# Altium PCB MMU.pcbdoc
Units mil, origin at the board's own origin, x right, y up, seen from the top; angles counter-clockwise.
Board outline 787.4 x 472.4 mil, 2 copper layers (Top Layer, Bottom Layer), stack 62.2 mil thick; 9 components, 7 nets, 52 pads, 17 vias.
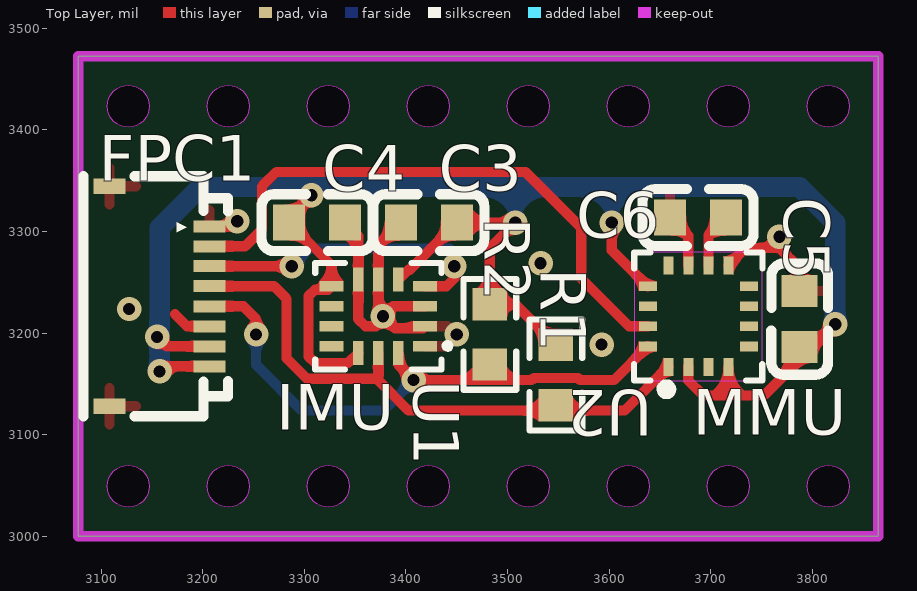
[diagram p0: Top Layer view]
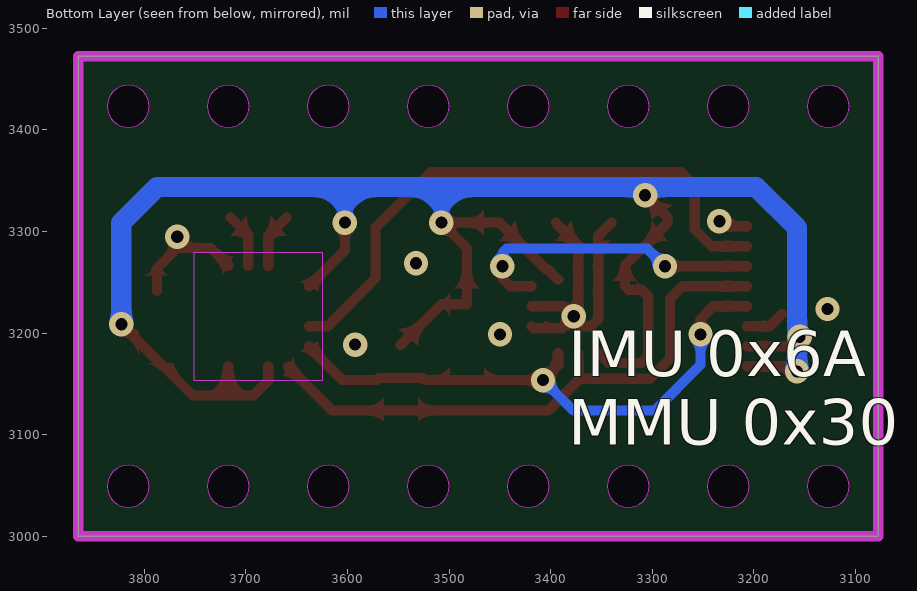
[diagram p1: Bottom Layer view, seen from below]

## Layer stack, top to bottom
Top Solder Mask Layer: solder mask 0.4, Dk 3.3
Top Layer: signal copper 1.4
Dielectric1: surface 59.4, FR4, Dk 4.5
Bottom Layer: signal copper 1.4
Bottom Solder Mask Layer: solder mask 0.4, Dk 3.3

## Board outline
3077.5,3472.4 3077.5,3000 3864.9,3000 3864.9,3472.4
cut-out: 3147.4,3423.2 3147,3419.2 3145.8,3415.3 3143.9,3411.7 3141.3,3408.6 3138.2,3406 3134.6,3404.1 3130.7,3403 3126.7,3402.6 3122.7,3403 3118.8,3404.1 3115.2,3406 3112.1,3408.6 3109.5,3411.7 3107.6,3415.3 3106.4,3419.2 3106,3423.2 3106.4,3427.3 3107.6,3431.1 3109.5,3434.7 3112.1,3437.8 3115.2,3440.4 3118.8,3442.3 3122.7,3443.5 3126.7,3443.9 3130.7,3443.5 3134.6,3442.3 3138.2,3440.4 3141.3,3437.8 3143.9,3434.7 3145.8,3431.1 3147,3427.3
cut-out: 3147.4,3049.2 3147,3045.2 3145.8,3041.3 3143.9,3037.7 3141.3,3034.6 3138.2,3032 3134.6,3030.1 3130.7,3028.9 3126.7,3028.5 3122.7,3028.9 3118.8,3030.1 3115.2,3032 3112.1,3034.6 3109.5,3037.7 3107.6,3041.3 3106.4,3045.2 3106,3049.2 3106.4,3053.2 3107.6,3057.1 3109.5,3060.7 3112.1,3063.8 3115.2,3066.4 3118.8,3068.3 3122.7,3069.5 3126.7,3069.9 3130.7,3069.5 3134.6,3068.3 3138.2,3066.4 3141.3,3063.8 3143.9,3060.7 3145.8,3057.1 3147,3053.2
cut-out: 3836.4,3049.2 3836,3045.2 3834.8,3041.3 3832.9,3037.7 3830.3,3034.6 3827.2,3032 3823.6,3030.1 3819.7,3028.9 3815.7,3028.5 3811.7,3028.9 3807.8,3030.1 3804.2,3032 3801.1,3034.6 3798.5,3037.7 3796.6,3041.3 3795.4,3045.2 3795,3049.2 3795.4,3053.2 3796.6,3057.1 3798.5,3060.7 3801.1,3063.8 3804.2,3066.4 3807.8,3068.3 3811.7,3069.5 3815.7,3069.9 3819.7,3069.5 3823.6,3068.3 3827.2,3066.4 3830.3,3063.8 3832.9,3060.7 3834.8,3057.1 3836,3053.2
cut-out: 3836.4,3423.2 3836,3419.2 3834.8,3415.3 3832.9,3411.7 3830.3,3408.6 3827.2,3406 3823.6,3404.1 3819.7,3403 3815.7,3402.6 3811.7,3403 3807.8,3404.1 3804.2,3406 3801.1,3408.6 3798.5,3411.7 3796.6,3415.3 3795.4,3419.2 3795,3423.2 3795.4,3427.3 3796.6,3431.1 3798.5,3434.7 3801.1,3437.8 3804.2,3440.4 3807.8,3442.3 3811.7,3443.5 3815.7,3443.9 3819.7,3443.5 3823.6,3442.3 3827.2,3440.4 3830.3,3437.8 3832.9,3434.7 3834.8,3431.1 3836,3427.3
cut-out: 3245.8,3049.2 3245.4,3045.2 3244.2,3041.3 3242.3,3037.7 3239.8,3034.6 3236.6,3032 3233,3030.1 3229.2,3028.9 3225.1,3028.5 3221.1,3028.9 3217.2,3030.1 3213.7,3032 3210.5,3034.6 3208,3037.7 3206,3041.3 3204.9,3045.2 3204.5,3049.2 3204.9,3053.2 3206,3057.1 3208,3060.7 3210.5,3063.8 3213.7,3066.4 3217.2,3068.3 3221.1,3069.5 3225.1,3069.9 3229.2,3069.5 3233,3068.3 3236.6,3066.4 3239.8,3063.8 3242.3,3060.7 3244.2,3057.1 3245.4,3053.2
cut-out: 3344.2,3049.2 3343.8,3045.2 3342.7,3041.3 3340.7,3037.7 3338.2,3034.6 3335,3032 3331.5,3030.1 3327.6,3028.9 3323.6,3028.5 3319.5,3028.9 3315.7,3030.1 3312.1,3032 3308.9,3034.6 3306.4,3037.7 3304.5,3041.3 3303.3,3045.2 3302.9,3049.2 3303.3,3053.2 3304.5,3057.1 3306.4,3060.7 3308.9,3063.8 3312.1,3066.4 3315.7,3068.3 3319.5,3069.5 3323.6,3069.9 3327.6,3069.5 3331.5,3068.3 3335,3066.4 3338.2,3063.8 3340.7,3060.7 3342.7,3057.1 3343.8,3053.2
cut-out: 3442.7,3049.2 3442.3,3045.2 3441.1,3041.3 3439.2,3037.7 3436.6,3034.6 3433.5,3032 3429.9,3030.1 3426,3028.9 3422,3028.5 3418,3028.9 3414.1,3030.1 3410.5,3032 3407.4,3034.6 3404.8,3037.7 3402.9,3041.3 3401.7,3045.2 3401.3,3049.2 3401.7,3053.2 3402.9,3057.1 3404.8,3060.7 3407.4,3063.8 3410.5,3066.4 3414.1,3068.3 3418,3069.5 3422,3069.9 3426,3069.5 3429.9,3068.3 3433.5,3066.4 3436.6,3063.8 3439.2,3060.7 3441.1,3057.1 3442.3,3053.2
cut-out: 3639.5,3049.2 3639.1,3045.2 3637.9,3041.3 3636,3037.7 3633.5,3034.6 3630.3,3032 3626.7,3030.1 3622.9,3028.9 3618.8,3028.5 3614.8,3028.9 3610.9,3030.1 3607.4,3032 3604.2,3034.6 3601.7,3037.7 3599.7,3041.3 3598.6,3045.2 3598.2,3049.2 3598.6,3053.2 3599.7,3057.1 3601.7,3060.7 3604.2,3063.8 3607.4,3066.4 3610.9,3068.3 3614.8,3069.5 3618.8,3069.9 3622.9,3069.5 3626.7,3068.3 3630.3,3066.4 3633.5,3063.8 3636,3060.7 3637.9,3057.1 3639.1,3053.2
cut-out: 3737.9,3049.2 3737.5,3045.2 3736.4,3041.3 3734.4,3037.7 3731.9,3034.6 3728.7,3032 3725.2,3030.1 3721.3,3028.9 3717.3,3028.5 3713.2,3028.9 3709.4,3030.1 3705.8,3032 3702.6,3034.6 3700.1,3037.7 3698.2,3041.3 3697,3045.2 3696.6,3049.2 3697,3053.2 3698.2,3057.1 3700.1,3060.7 3702.6,3063.8 3705.8,3066.4 3709.4,3068.3 3713.2,3069.5 3717.3,3069.9 3721.3,3069.5 3725.2,3068.3 3728.7,3066.4 3731.9,3063.8 3734.4,3060.7 3736.4,3057.1 3737.5,3053.2
cut-out: 3541.1,3049.2 3540.7,3045.2 3539.5,3041.3 3537.6,3037.7 3535,3034.6 3531.9,3032 3528.3,3030.1 3524.4,3028.9 3520.4,3028.5 3516.4,3028.9 3512.5,3030.1 3508.9,3032 3505.8,3034.6 3503.2,3037.7 3501.3,3041.3 3500.1,3045.2 3499.7,3049.2 3500.1,3053.2 3501.3,3057.1 3503.2,3060.7 3505.8,3063.8 3508.9,3066.4 3512.5,3068.3 3516.4,3069.5 3520.4,3069.9 3524.4,3069.5 3528.3,3068.3 3531.9,3066.4 3535,3063.8 3537.6,3060.7 3539.5,3057.1 3540.7,3053.2
cut-out: 3245.8,3423.2 3245.4,3419.2 3244.2,3415.3 3242.3,3411.7 3239.8,3408.6 3236.6,3406 3233,3404.1 3229.2,3403 3225.1,3402.6 3221.1,3403 3217.2,3404.1 3213.7,3406 3210.5,3408.6 3208,3411.7 3206,3415.3 3204.9,3419.2 3204.5,3423.2 3204.9,3427.3 3206,3431.1 3208,3434.7 3210.5,3437.8 3213.7,3440.4 3217.2,3442.3 3221.1,3443.5 3225.1,3443.9 3229.2,3443.5 3233,3442.3 3236.6,3440.4 3239.8,3437.8 3242.3,3434.7 3244.2,3431.1 3245.4,3427.3
cut-out: 3344.2,3423.2 3343.8,3419.2 3342.7,3415.3 3340.7,3411.7 3338.2,3408.6 3335,3406 3331.5,3404.1 3327.6,3403 3323.6,3402.6 3319.5,3403 3315.7,3404.1 3312.1,3406 3308.9,3408.6 3306.4,3411.7 3304.5,3415.3 3303.3,3419.2 3302.9,3423.2 3303.3,3427.3 3304.5,3431.1 3306.4,3434.7 3308.9,3437.8 3312.1,3440.4 3315.7,3442.3 3319.5,3443.5 3323.6,3443.9 3327.6,3443.5 3331.5,3442.3 3335,3440.4 3338.2,3437.8 3340.7,3434.7 3342.7,3431.1 3343.8,3427.3
cut-out: 3442.7,3423.2 3442.3,3419.2 3441.1,3415.3 3439.2,3411.7 3436.6,3408.6 3433.5,3406 3429.9,3404.1 3426,3403 3422,3402.6 3418,3403 3414.1,3404.1 3410.5,3406 3407.4,3408.6 3404.8,3411.7 3402.9,3415.3 3401.7,3419.2 3401.3,3423.2 3401.7,3427.3 3402.9,3431.1 3404.8,3434.7 3407.4,3437.8 3410.5,3440.4 3414.1,3442.3 3418,3443.5 3422,3443.9 3426,3443.5 3429.9,3442.3 3433.5,3440.4 3436.6,3437.8 3439.2,3434.7 3441.1,3431.1 3442.3,3427.3
cut-out: 3541.1,3423.2 3540.7,3419.2 3539.5,3415.3 3537.6,3411.7 3535,3408.6 3531.9,3406 3528.3,3404.1 3524.4,3403 3520.4,3402.6 3516.4,3403 3512.5,3404.1 3508.9,3406 3505.8,3408.6 3503.2,3411.7 3501.3,3415.3 3500.1,3419.2 3499.7,3423.2 3500.1,3427.3 3501.3,3431.1 3503.2,3434.7 3505.8,3437.8 3508.9,3440.4 3512.5,3442.3 3516.4,3443.5 3520.4,3443.9 3524.4,3443.5 3528.3,3442.3 3531.9,3440.4 3535,3437.8 3537.6,3434.7 3539.5,3431.1 3540.7,3427.3
cut-out: 3639.5,3423.2 3639.1,3419.2 3637.9,3415.3 3636,3411.7 3633.5,3408.6 3630.3,3406 3626.7,3404.1 3622.9,3403 3618.8,3402.6 3614.8,3403 3610.9,3404.1 3607.4,3406 3604.2,3408.6 3601.7,3411.7 3599.7,3415.3 3598.6,3419.2 3598.2,3423.2 3598.6,3427.3 3599.7,3431.1 3601.7,3434.7 3604.2,3437.8 3607.4,3440.4 3610.9,3442.3 3614.8,3443.5 3618.8,3443.9 3622.9,3443.5 3626.7,3442.3 3630.3,3440.4 3633.5,3437.8 3636,3434.7 3637.9,3431.1 3639.1,3427.3
cut-out: 3737.9,3423.2 3737.5,3419.2 3736.4,3415.3 3734.4,3411.7 3731.9,3408.6 3728.7,3406 3725.2,3404.1 3721.3,3403 3717.3,3402.6 3713.2,3403 3709.4,3404.1 3705.8,3406 3702.6,3408.6 3700.1,3411.7 3698.2,3415.3 3697,3419.2 3696.6,3423.2 3697,3427.3 3698.2,3431.1 3700.1,3434.7 3702.6,3437.8 3705.8,3440.4 3709.4,3442.3 3713.2,3443.5 3717.3,3443.9 3721.3,3443.5 3725.2,3442.3 3728.7,3440.4 3731.9,3437.8 3734.4,3434.7 3736.4,3431.1 3737.5,3427.3

## Design rules (kind name [scope] priority, off if disabled: settings)
BoardOutlineClearance copperThickness1oz [All] p0: genericclearance=10 ignorepadtopadclearanceinfootprint=FALSE except(0: Arc-SplitContinuation Track-SplitContinuation SMDPad-SplitContinuation THPad-SplitContinuation Via-SplitContinuation Fill-SplitContinuation Poly-SplitContinuation Region-SplitContinuation Text-SplitContinuation)
BoardOutlineClearance copperThickness2oz [All] p0: genericclearance=10 ignorepadtopadclearanceinfootprint=FALSE except(0: Arc-SplitContinuation Track-SplitContinuation SMDPad-SplitContinuation THPad-SplitContinuation Via-SplitContinuation Fill-SplitContinuation Poly-SplitContinuation Region-SplitContinuation Text-SplitContinuation)
BoardOutlineClearance otherClearance [All] p0: genericclearance=10 ignorepadtopadclearanceinfootprint=FALSE except(0: Arc-SplitContinuation Track-SplitContinuation SMDPad-SplitContinuation THPad-SplitContinuation Via-SplitContinuation Fill-SplitContinuation Poly-SplitContinuation Region-SplitContinuation Text-SplitContinuation)
Clearance copperThickness1oz [All] p1: gap=7 ignorepadtopadclearanceinfootprint=FALSE
Clearance copperThickness2oz [All] p1: gap=7 ignorepadtopadclearanceinfootprint=FALSE
Clearance otherClearance [All] p1: gap=7 ignorepadtopadclearanceinfootprint=FALSE
DiffPairsRouting differentialPair [All] p1: maxuncoupledlength=10 minlimit=6 maxlimit=Infinity mostfreqgap=6 toplayer_minwidth=5 toplayer_prefwidth=10 toplayer_maxwidth=100 bottomlayer_minwidth=5 bottomlayer_prefwidth=10 bottomlayer_maxwidth=100
PasteMaskExpansion pasteMaskExpansion [All] p1: expansion=0
PlaneConnect innerPlane [All] p1: planeconnectstyle=Relief reliefexpansion=20 reliefentries=4 reliefconductorwidth=10 reliefairgap=10
PolygonConnect copperRegion [All] p1: connectstyle=Relief reliefentries=4 reliefconductorwidth=10 polygonreliefangle="90 Angle" airgapwidth=10
RoutingVias viaSize [All] p1: viastyle="Through Hole" holewidth=12.0078 minholewidth=11.811 maxholewidth=248.0314 width=12.0078 minwidth=11.811 maxwidth=248.0314
SolderMaskExpansion solderMaskExpansion [IsVia] p1: useseparateexpansions=TRUE expansion=-1000 expansionbottom=-1000
SolderMaskExpansion solderMaskExpansion [All] p2: useseparateexpansions=TRUE expansion=2 expansionbottom=2
Width copperThickness1oz [All] p1: maxlimit=100 minlimit=5 preferedwidth=10
Width copperThickness2oz [All] p1: maxlimit=100 minlimit=8 preferedwidth=10

## Components (designator, comment, footprint, x,y, rotation, side; value= is the part's Value field where it differs from the comment)
C3 "100nF" C0603#1 3422.5,3308.7 r0 top
C4 "100nF" C0603#1 3312.5,3308.7 r180 top
C5 "1uF" C0603#2 3787.5,3213.7 r270 top
C6 "10uF" C0603#1 3687.5,3313.7 r0 top
FPC1 "HC-FPC-05-09-8RLTAG" FPC-SMD_8P-P0.50_HC-FPC-05-09-8RLTAG 3157.5,3236.2 r90 top
R1 "4.7kΩ" R0603 3547.5,3158.7 r270 top
R2 "4.7kΩ" R0603 3482.5,3198.7 r270 top
U1 "LSM6DSV16XTR" LGA-14_L3.0-W2.5-P0.50-BR 3372.8,3216.5 r0 top
U2 "MMC5983MA" LGA-16_L3.0-W3.0-P0.50-BL_SQ 3687.7,3216.5 r0 top

## Footprints (in the part's own frame and the unit in brackets; to place one, negate y for a bottom-side part, rotate by r counter-clockwise, add the part's x,y. Pads: shape width x height; smd on the part's side, far side on the other; paste and mask are expansions set on the pad)
C0603#1 [mil]
  rect 31.5x35.4 smd: 1(-27.6,0) 2(27.6,0)
  silkscreen extent -55,-28 55,28
C0603#2 [mil]
  rect 31.5x35.4 smd: 1(-27.6,0) 2(27.5,0)
  silkscreen extent -55,-28 55,28
FPC-SMD_8P-P0.50_HC-FPC-05-09-8RLTAG [mil]
  rect 11.8x31.5 smd paste+0 mask+2: 1(68.9,-49.2) 2(49.2,-49.2) 3(29.6,-49.2) 4(9.9,-49.2) 5(-9.8,-49.2) 6(-29.5,-49.2) 7(-49.2,-49.2) 8(-68.9,-49.2)
  rect 15.7x31.5 smd paste+0 mask+2: 9(-108.2,49.2) 10(108.3,49.2)
  silkscreen extent -118,-67 118,75
LGA-14_L3.0-W2.5-P0.50-BR [mil]
  rect 23.6x10.6 smd: 1(46,-29.5) 2(46,-9.8) 3(46,9.9) 4(46,29.6) 8(-46.1,29.6) 9(-46.1,9.9) 10(-46.1,-9.8) 11(-46.1,-29.5)
  rect 10.6x23.6 smd: 5(19.7,36.3) 6(0,36.3) 7(-19.7,36.3) 12(-19.7,-36.2) 13(0,-36.2) 14(19.7,-36.2)
  silkscreen extent -62,-52 71,52
LGA-16_L3.0-W3.0-P0.50-BL_SQ [mil]
  rect 9.8x17.7 smd: 1(-29.5,-49.7) 2(-9.8,-49.7) 3(9.9,-49.7) 4(29.6,-49.7) 9(29.6,49.8) 10(9.9,49.8) 11(-9.8,49.8) 12(-29.5,49.8)
  rect 17.7x9.8 smd: 5(49.8,-29.5) 6(49.8,-9.8) 7(49.8,9.9) 8(49.8,29.6) 13(-49.7,29.6) 14(-49.7,9.9) 15(-49.7,-9.8) 16(-49.7,-29.5)
  silkscreen extent -63,-77 63,63
R0603 [mil]
  rect 31.8x34 smd paste-3937 mask+2: 1(-29.7,0) 2(29.6,0)
  silkscreen extent -55,-26 55,26

## Via types
v1: diameter 24, hole 12, Top Layer to Bottom Layer, 17 vias

## Nets (pads, with @x,y where several pads share a name; then routed paths per layer and width w, separated by ;. In a path a pad name is that pad's centre, name@x,y a point inside that pad or via, vN(x,y) a via of type N, cw(c..) or ccw(c..) an arc to the next point about the centre after c; other vN are vias at no path point)
3V3: C3.2 C4.2 C5.2 FPC1.7 FPC1.8 R1.1 R2.1 U1.5 U1.8 U1.12 U2.2 U2.4 U2.13 | length 1983.3
  Top Layer w10: v1(3155,3196.2) 3164.2,3187 FPC1.7 ; v1(3157.5,3162.3) 3162.5,3167.3 FPC1.8 ; v1(3307,3335.7) 3284.9,3313.7 C4.2 3326.7,3267 U1.8 3323.3,3242.7 3310.4,3242.7 3303.9,3236.3 3303.9,3177.2 3310.4,3170.7 3343.1,3170.7 3352.7,3180.3 U1.12 ; U1.5 3392.9,3252.8 3402.5,3262.4 3403.7,3262.4 C3.2 v1(3507.5,3308.7) 3482.5,3283.7 R2.1 3507.5,3228.4 R1.1 ; v1(3602.5,3308.7) 3602.5,3281.6 U2.13 ; U2.2 3677.9,3153.3 3692.5,3138.7 3716.3,3138.7 ; U2.4 3717.5,3166.6 3717.5,3139.9 3716.3,3138.7 ; v1(3822.5,3208.7) 3752.5,3138.7 3716.3,3138.7
  Bottom Layer w10: 3505.8,3343.7 3507.5,3342.1 v1(3507.5,3308.7) ; v1(3602.5,3308.7) 3602.5,3341.6 3604.7,3343.7
  Bottom Layer w20: v1(3157.5,3162.3) 3157.5,3303.7 3197.5,3343.7 3505.8,3343.7 3604.7,3343.7 3787.5,3343.7 3822.5,3308.7 v1(3822.5,3208.7)
$1N27: C6.2 U2.10 | length 54.7
  Top Layer w10: U2.10 3697.6,3296.3 C6.2
GND: C3.1 C4.1 C5.1 C6.1 FPC1.1 FPC1.6 FPC1.9 FPC1.10 U1.1 U1.2 U1.3 U1.6 U1.7 U2.9 U2.11 | length 560.6
  Top Layer w10: 3172.5,3218.7 3184.5,3206.7 FPC1.6 ; FPC1.1 3228.9,3305.1 v1(3233.9,3310.1) ; C4.1 3353.1,3295.7 U1.7 3353.1,3213.7 3360.2,3206.7 3370.2,3206.7 3377.3,3213.8 v1(3377.3,3216.6) ; C3.1 3372.8,3286.6 U1.6 3372.8,3221 v1(3377.3,3216.6) ; U1.2 3416.8,3204.7 3389.1,3204.7 v1(3377.3,3216.6) ; U1.3 3387.1,3226.4 v1(3377.3,3216.6) ; C6.1 3677.9,3295.8 U2.11 ; U2.9 3734.7,3283.7 3767.5,3283.7 3787.5,3263.7 C5.1
  other v1: 3592.5,3188.7 3449.9,3198.7 3127.5,3223.7 3532.5,3268.7 3767.5,3294.9
IMU_INT: FPC1.3 U1.4 | length 306.6
  Top Layer w10: FPC1.3 v1(3287.5,3265.8) ; U1.4 3439.8,3246.1 3447.5,3253.7 v1(3447.5,3265.8)
  Bottom Layer w10: v1(3287.5,3265.8) 3304.8,3283.1 3443.2,3283.1 3447.5,3278.7 v1(3447.5,3265.8)
MMU_INT: FPC1.2 U2.15 | length 578.8
  Top Layer w10: FPC1.2 3241.7,3285.4 3258.2,3301.9 3258.2,3344.4 3272.5,3358.7 3517.5,3358.7 3572.5,3303.7 3572.5,3253.7 3619.5,3206.7 U2.15
SCL: FPC1.4 R1.2 U1.13 U2.1 | length 581.3
  Top Layer w10: FPC1.4 3270.2,3246.1 3282.5,3233.7 3282.5,3175 3302.5,3155 3371.2,3155 3372.8,3153.5 ; U1.13 3372.8,3153.5 ; U2.1 3615.1,3123.7 3402.5,3123.7 3372.8,3153.5
SDA: FPC1.5 R2.2 U1.14 U2.16 | length 561.1
  Top Layer w10: FPC1.5 3239.9,3226.4 3252.5,3213.7 v1(3252.5,3198.7) ; U1.14 3392.5,3168.8 v1(3407.5,3153.7) 3523.7,3153.7 3525.9,3155.9 3569.1,3155.9 3571.3,3153.7 3604.8,3153.7 U2.16
  Bottom Layer w10: v1(3252.5,3198.7) 3252.5,3168.7 3297.5,3123.7 3377.5,3123.7 v1(3407.5,3153.7)
pads on no net: U1.9 U1.10 U1.11 U2.3 U2.5 U2.6 U2.7 U2.8 U2.12 U2.14

## Polygon pours and split planes (outlines as drawn)
GND on Top Layer (solid, remove dead copper, pour order 0): 3077.5,3472.4 3077.5,3000 3864.9,3000 3864.9,3472.4
GND on Bottom Layer (solid, remove dead copper, pour order 2): 3077.5,3472.4 3077.5,3000 3864.9,3000 3864.9,3472.4

## Keep-outs
Board Outline Layer:
  drawing of 549 lines, arcs and shapes, not listed

## Other copper
Top Layer:
  region net 3V3: 3176,3162.3 3176,3172.3 3183.5,3172.5 3191,3173.2 3191,3161.4 3183.5,3162.1 3176,3162.3
  region net 3V3: 3176,3182 3176,3192 3183.5,3192.2 3191,3192.9 3191,3181.1 3183.5,3181.8 3176,3182
  region net GND: 3184.5,3201.7 3184.5,3211.7 3187.8,3211.9 3191,3212.6 3191,3200.8 3187.8,3201.5 3184.5,3201.7
  region net SDA: 3237.5,3231.4 3237.5,3221.4 3229.9,3221.2 3222.5,3220.5 3222.5,3232.3 3229.9,3231.6 3237.5,3231.4
  region net SCL: 3237.5,3251.1 3237.5,3241.1 3229.9,3240.8 3222.5,3240.2 3222.5,3252 3229.9,3251.3 3237.5,3251.1
  region net IMU_INT: 3237.5,3270.8 3237.5,3260.8 3229.9,3260.5 3222.5,3259.8 3222.5,3271.7 3229.9,3271 3237.5,3270.8
  region net MMU_INT: 3237.5,3290.4 3237.5,3280.4 3229.9,3280.2 3222.5,3279.5 3222.5,3291.3 3229.9,3290.7 3237.5,3290.4
  region net GND: 3228.9,3310.1 3228.9,3300.1 3225.6,3299.9 3222.5,3299.2 3222.5,3311 3225.6,3310.3 3228.9,3310.1
  region net 3V3: 3296,3331.8 3306,3327.7 3303.7,3324 3302,3320.1 3301,3316 3300.7,3311.7 3280,3326.5 3284.3,3326.8 3288.4,3327.8 3292.4,3329.5 3296,3331.8
  region net 3V3: 3306,3294.8 3300.9,3285.7 3297.3,3288 3293.4,3289.7 3289.2,3290.7 3285,3291 3300.7,3310.7 3301,3306.4 3302,3302.3 3303.7,3298.4 3306,3294.8
  region net GND: 3358.1,3276 3348.1,3276 3347.8,3279.5 3346.8,3282.8 3345.3,3285.9 3343.2,3288.7 3340.6,3291 3355.8,3291 3356.1,3286 3356.8,3280.9 3358.1,3276
  region net GND: 3392,3199.7 3392,3209.7 3397.1,3209.9 3402.1,3210.7 3407,3212 3407,3201.4 3402,3201.2 3397,3200.6 3392,3199.7
  region net GND: 3392,3221.4 3392,3231.4 3399.5,3231.5 3407,3231.7 3407,3221.1 3399.5,3221.3 3392,3221.4
  region net IMU_INT: 3439.8,3251.1 3439.8,3241.1 3435.2,3241 3430.7,3240.8 3430.7,3251.4 3435.2,3251.2 3439.8,3251.1
  region net GND: 3377.8,3226 3367.8,3226 3367.7,3233.5 3367.5,3241 3378.1,3241 3377.9,3233.5 3377.8,3226
  region net GND: 3367.8,3279.6 3377.8,3279.6 3377.9,3272.1 3378.1,3264.6 3367.5,3264.6 3367.7,3272.1 3367.8,3279.6
  region net GND: 3358.1,3226 3348.1,3226 3348,3233.5 3347.8,3241 3358.4,3241 3358.2,3233.5 3358.1,3226
  region net GND: 3348.1,3279.6 3358.1,3279.6 3358.2,3272.1 3358.4,3264.6 3347.8,3264.6 3348,3272.1 3348.1,3279.6
  region net 3V3: 3310.4,3237.7 3310.4,3247.7 3311.9,3248 3313.3,3248.7 3314.3,3249.9 3314.9,3251.4 3314.9,3240.8 3313,3240.4 3311.4,3239.3 3310.4,3237.7
  region net 3V3: 3321.7,3266.4 3331.7,3266.4 3332,3263 3332.9,3259.7 3334.3,3256.6 3336.2,3253.8 3338.5,3251.4 3314.9,3251.4 3317.3,3253.8 3319.2,3256.6 3320.6,3259.7 3321.4,3263 3321.7,3266.4
  region net SCL: 3377.8,3153.5 3367.8,3153.5 3367.7,3161 3367.5,3168.5 3378.1,3168.5 3377.9,3161 3377.8,3153.5
  region net SDA: 3403.1,3165.2 3397,3157.2 3392.3,3163 3387.1,3168.5 3397.8,3181.1 3398.1,3176.9 3399.1,3172.8 3400.8,3168.8 3403.1,3165.2
  region net 3V3: 3434.1,3285.7 3429,3294.8 3431.3,3298.4 3433,3302.3 3434,3306.4 3434.3,3310.7 3450,3291 3445.8,3290.7 3441.6,3289.7 3437.7,3288 3434.1,3285.7
  region net 3V3: 3480.8,3313.7 3480.8,3303.7 3477.4,3303.4 3474,3302.5 3470.9,3300.9 3468.1,3298.8 3465.8,3296.2 3465.8,3321.2 3468.1,3318.7 3470.9,3316.6 3474,3315 3477.4,3314.1 3480.8,3313.7
  region net GND: 3379,3285.7 3373.9,3294.8 3376.2,3298.4 3377.8,3302.3 3378.8,3306.4 3379.2,3310.7 3394.9,3291 3390.7,3290.7 3386.5,3289.7 3382.6,3288 3379,3285.7
  region net SDA: 3514.5,3158.7 3514.5,3148.7 3511,3150.7 3507.3,3152.1 3503.5,3152.9 3499.5,3153.2 3499.5,3166.2 3501.8,3163.7 3504.6,3161.6 3507.7,3160 3511.1,3159.1 3514.5,3158.7
  region net SDA: 3450.5,3148.7 3450.5,3158.7 3453.9,3159.1 3457.3,3160 3460.4,3161.6 3463.2,3163.7 3465.5,3166.2 3465.5,3153.2 3461.5,3152.9 3457.7,3152.1 3454,3150.7 3450.5,3148.7
  region net 3V3: 3477.5,3259.3 3487.5,3259.3 3487.8,3255.8 3488.8,3252.5 3490.3,3249.4 3492.4,3246.6 3495,3244.3 3470,3244.3 3472.6,3246.6 3474.7,3249.4 3476.2,3252.5 3477.2,3255.8 3477.5,3259.3
  region net 3V3: 3507.5,3233.4 3507.5,3223.4 3505.1,3223 3503,3222 3501.2,3220.3 3500,3218.3 3499.5,3215.9 3499.5,3240.9 3500,3238.6 3501.2,3236.5 3503,3234.8 3505.1,3233.8
  region net SCL: 3515.5,3118.7 3515.5,3128.7 3518.9,3129.1 3522.3,3130 3525.4,3131.6 3528.2,3133.7 3530.5,3136.2 3530.5,3113.2 3527.2,3115.6 3523.5,3117.3 3519.6,3118.4
  region net SCL: 3579.5,3128.7 3579.5,3118.7 3575.4,3118.4 3571.5,3117.3 3567.8,3115.6 3564.5,3113.2 3564.5,3136.2 3566.8,3133.7 3569.6,3131.6 3572.7,3130 3576.1,3129.1 3579.5,3128.7
  region net 3V3: 3525.2,3203.6 3533.4,3209.6 3537,3207.3 3540.9,3205.6 3545.1,3204.6 3549.3,3204.3 3530.5,3187.7 3530.1,3192 3529.1,3196.1 3527.5,3200 3525.2,3203.6
  region net SDA: 3632.9,3174.8 3621.9,3178 3624.5,3181 3626.6,3184.4 3628.2,3188.1 3629.2,3191.9 3646.9,3182.1 3643,3181.1 3639.3,3179.5 3635.9,3177.4 3632.9,3174.8
  region net 3V3: 3621.9,3255.1 3632.9,3258.2 3635.9,3255.6 3639.3,3253.5 3643,3252 3646.9,3251 3629.2,3241.1 3628.2,3245 3626.6,3248.7 3624.5,3252.1 3621.9,3255.1
  region net GND: 3726.3,3282.4 3729.4,3271.4 3726.8,3268.3 3724.7,3264.9 3723.2,3261.3 3722.2,3257.4 3712.3,3275.1 3716.2,3276.1 3719.9,3277.7 3723.3,3279.8 3726.3,3282.4
  region net 3V3: 3722.5,3143 3712.5,3143 3712.5,3150.5 3712.3,3158 3722.2,3158 3722.3,3150.5 3722.5,3143
  region net SCL: 3649.2,3150.7 3646,3161.7 3648.6,3164.7 3650.7,3168.1 3652.3,3171.8 3653.3,3175.7 3663.1,3158 3659.3,3157 3655.6,3155.4 3652.2,3153.3 3649.2,3150.7
  region net $1N27: 3701.1,3292.7 3694,3299.8 3696.3,3303.4 3698,3307.3 3699,3311.4 3699.3,3315.7 3715,3296 3710.2,3295.7 3705.6,3294.5 3701.1,3292.7
  region net GND: 3681,3299.8 3674.4,3292.3 3671,3293.9 3667.4,3295.1 3663.7,3295.8 3660,3296 3675.7,3315.7 3676,3311.4 3677,3307.3 3678.7,3303.4 3681,3299.8
  region net 3V3: 3783.4,3162.5 3763.8,3157.1 3766.4,3160 3768.6,3163.3 3770.4,3166.8 3771.7,3170.4 3796.7,3170.4 3793,3169.1 3789.5,3167.3 3786.3,3165.1 3783.4,3162.5
  region net 3V3: 3817.5,3210.8 3813.1,3192.3 3810.5,3189.3 3808.3,3186.1 3806.5,3182.6 3805.2,3179 3805.2,3201.9 3809.6,3204.5 3813.7,3207.4 3817.5,3210.8
  region net GND: 3782.5,3263.7 3792.5,3263.7 3793.1,3261.6 3794.2,3259.8 3795.8,3258.3 3797.8,3257.4 3800,3257 3775,3257 3777.2,3257.4 3779.2,3258.3 3780.8,3259.8 3781.9,3261.6 3782.5,3263.7
  region net 3V3: 3167.8,3190.5 3160.7,3183.5 3158.5,3183.9 3154.2,3184.3 3167,3197 3167.4,3192.7
  region net 3V3: 3169.4,3172.3 3176.9,3162.3 3175.7,3162.2 3174.4,3161.9 3173.1,3161.4 3171.9,3160.8 3170.8,3160.1 3169.8,3159.2 3169,3158.3 3168.5,3157.4 3161,3173.8 3165.5,3172.8 3167.7,3172.4
  region net GND: 3222,3300.1 3214.5,3310.1 3215.7,3310.2 3217,3310.5 3218.2,3311 3219.5,3311.6 3220.6,3312.4 3221.6,3313.2 3222.3,3314.1 3222.9,3315 3230.4,3298.6 3225.9,3299.6 3223.6,3300
  region net SDA: 3247.5,3213.7 3257.5,3213.7 3257.8,3212.4 3258.8,3210.6 3260,3208.6 3261.5,3206.7 3243.5,3206.7 3245,3208.6 3246.2,3210.6 3247.2,3212.4
  region net IMU_INT: 3271.2,3260.8 3271.2,3270.8 3273,3271.1 3275.2,3272 3277.6,3273.3 3279.6,3274.8 3279.6,3256.7 3277.6,3258.2 3275.2,3259.5 3273,3260.4
  region net 3V3: 3299,3320.7 3291.9,3327.7 3293,3329.2 3293.9,3331.5 3294.7,3334 3295,3336.5 3307.8,3323.8 3305.3,3323.4 3302.8,3322.6 3300.5,3321.7
  region net GND: 3367.8,3229 3377.8,3235.7 3377.9,3234.5 3378.2,3233.3 3379.3,3230.8 3380.9,3228.7 3381.7,3227.9 3382.6,3227.3 3365.9,3220.6 3367.2,3225.1 3367.6,3227.3
  region net GND: 3373.7,3203.1 3366.6,3210.2 3366.8,3210.6 3366.8,3211.2 3366.3,3212.7 3365.7,3214.2 3365.3,3215.3 3380,3204.9 3375.8,3203.8
  region net GND: 3392.4,3208.5 3385.3,3201.5 3383.8,3202.5 3381.5,3203.5 3379,3204.2 3376.5,3204.6 3389.2,3217.3 3389.6,3214.9 3390.4,3212.3 3391.3,3210.1
  region net GND: 3383.6,3229.9 3390.6,3222.9 3390.2,3222 3389.8,3220.3 3389.2,3215.8 3376.5,3228.5 3381,3229.1 3382.7,3229.5
  region net SDA: 3392.4,3161.8 3399.5,3168.8 3401,3167.8 3403.2,3166.8 3405.8,3166.1 3408.3,3165.7 3395.5,3153 3395.1,3155.4 3394.4,3158 3393.4,3160.2
  region net SDA: 3423.8,3158.7 3423.8,3148.7 3422,3148.4 3419.8,3147.5 3417.4,3146.2 3415.4,3144.7 3415.4,3162.7 3417.4,3161.3 3419.8,3160 3422,3159.1
  region net IMU_INT: 3452.5,3253.7 3442.5,3253.7 3442.4,3254.3 3442,3254.9 3440.8,3256.1 3439.4,3257 3438.5,3257.8 3456.5,3257.8 3455.6,3257 3454.2,3256.1 3453,3254.9 3452.6,3254.3
  region net 3V3: 3491.2,3303.7 3491.2,3313.7 3493,3314.1 3495.2,3315 3497.6,3316.3 3499.6,3317.7 3499.6,3299.7 3497.6,3301.2 3495.2,3302.5 3493,3303.4
  region net 3V3: 3499.5,3293.6 3492.4,3300.7 3493.4,3302.2 3494.4,3304.5 3495.1,3307 3495.5,3309.5 3508.3,3296.8 3505.8,3296.4 3503.2,3295.6 3501,3294.7
  region net 3V3: 3607.5,3292.4 3597.5,3292.4 3597.2,3294.2 3596.2,3296.5 3595,3298.8 3593.5,3300.8 3611.5,3300.8 3610,3298.8 3608.8,3296.5 3607.8,3294.2
  region net GND: 3764.5,3278.7 3747.3,3288.7 3749,3288.8 3750.6,3289.1 3752.1,3289.4 3753.4,3289.9 3754.4,3290.5 3755.2,3291.1 3755.7,3291.8 3755.7,3292.5 3772.9,3284.1 3771.3,3282.9 3769.3,3281.1 3768.1,3280.2 3767,3279.5 3765.7,3278.9
  region net GND: 3779.9,3278.5 3764.4,3279.8 3762.7,3281.6 3761.3,3283.5 3760.1,3285.1 3759.1,3286.3 3776.8,3287.3 3776.4,3286.5 3776.3,3285.6 3776.4,3284.5 3776.8,3283.3 3777.3,3282.1 3778,3280.8 3778.9,3279.6
  region net 3V3: 3814.5,3193.6 3807.4,3200.7 3808.4,3202.2 3809.4,3204.5 3810.1,3207 3810.5,3209.5 3823.3,3196.8 3820.8,3196.4 3818.2,3195.6 3816,3194.7
  region net 3V3: 3722.5,3166.6 3722.8,3162.3 3723.7,3158.1 3725.1,3154.1 3727.1,3150.3 3729.6,3146.8 3732.5,3143.7 3716.3,3138.7 3702.5,3143.7 3705.4,3146.8 3707.9,3150.3 3709.9,3154.1 3711.3,3158.1 3712.2,3162.3 3712.5,3166.6 3722.5,3166.6
Bottom Layer:
  region net 3V3: 3167.5,3180.3 3147.5,3179.1 3147.3,3184.6 3147,3186.6 3146.7,3187.5 3164.4,3188.7 3164.2,3188.1 3164.4,3187.3 3165.5,3185.3 3166.9,3182.9 3167.3,3181.6
  region net 3V3: 3147.5,3213.4 3167.5,3212.1 3167.3,3210.9 3166.9,3209.6 3165.5,3207.2 3164.4,3205.2 3164.2,3204.4 3164.4,3203.7 3146.7,3205 3147,3205.9 3147.3,3207.9
  region net 3V3: 3147.5,3176.7 3167.5,3176.7 3167.6,3174.6 3167.8,3172.5 3168.5,3168.5 3169.2,3165 3169.5,3162.3 3145.5,3162.3 3145.8,3165 3146.5,3168.5 3147.2,3172.5 3147.4,3174.6
  region net SDA: 3257.5,3182.4 3247.5,3182.4 3247.2,3184.2 3246.2,3186.5 3245,3188.8 3243.5,3190.8 3261.5,3190.8 3260,3188.8 3258.8,3186.5 3257.8,3184.2
  region net IMU_INT: 3295.5,3280.8 3302.6,3273.8 3301.6,3272.3 3300.6,3270 3299.9,3267.5 3299.5,3265 3286.7,3277.7 3289.2,3278.1 3291.8,3278.8 3294,3279.8
  region net 3V3: 3287,3333.7 3296.6,3353.7 3297.8,3353.5 3299,3352.7 3300.2,3351.7 3301.3,3350.5 3303.3,3348.4 3304.2,3347.8 3305,3347.6 3295.4,3332.8 3294.6,3333.1 3292.7,3333.4 3290,3333.7
  region net 3V3: 3317.4,3353.7 3327.1,3333.7 3324,3333.7 3321.4,3333.4 3319.4,3333.1 3318.6,3332.8 3309,3347.6 3309.8,3347.8 3310.7,3348.4 3312.7,3350.5 3313.8,3351.7 3315,3352.7 3316.2,3353.5
  region net SDA: 3399.5,3138.6 3392.4,3145.7 3393.4,3147.2 3394.4,3149.5 3395.1,3152 3395.5,3154.5 3408.3,3141.8 3405.8,3141.4 3403.2,3140.6 3401,3139.7
  region net IMU_INT: 3442.5,3278.7 3452.5,3278.7 3453.8,3277 3456.5,3273.7 3438.5,3273.7 3441.2,3277
  region net 3V3: 3502.5,3325.1 3512.5,3325.1 3512.8,3323.3 3513.8,3321 3515,3318.7 3516.5,3316.7 3498.5,3316.7 3500,3318.7 3501.2,3321 3502.2,3323.3
  region net 3V3: 3597.5,3325.1 3607.5,3325.1 3607.8,3323.3 3608.8,3321 3610,3318.7 3611.5,3316.7 3593.5,3316.7 3595,3318.7 3596.2,3321 3597.2,3323.3
  region net 3V3: 3812.5,3223.1 3832.5,3223.1 3832.6,3221 3832.8,3218.9 3833.5,3214.9 3834.2,3211.4 3834.5,3208.7 3810.5,3208.7 3810.8,3211.4 3811.5,3214.9 3812.2,3218.9 3812.4,3221
  region net 3V3: 3502.5,3308.7 3502.1,3313.1 3501,3317.3 3499.2,3321.2 3496.7,3324.8 3493.6,3327.9 3490,3330.4 3486.1,3332.2 3481.8,3333.4 3477.5,3333.7 3505.8,3343.7 3537.5,3333.7 3533.2,3333.4 3528.9,3332.2 3525,3330.4 3521.4,3327.9 3518.3,3324.8 3515.8,3321.2 3514,3317.3 3512.9,3313.1 3512.5,3308.7
  region net 3V3: 3607.5,3308.7 3607.9,3313.1 3609,3317.3 3610.8,3321.2 3613.3,3324.8 3616.4,3327.9 3620,3330.4 3623.9,3332.2 3628.2,3333.4 3632.5,3333.7 3604.7,3343.7 3572.5,3333.7 3576.8,3333.4 3581.1,3332.2 3585,3330.4 3588.6,3327.9 3591.7,3324.8 3594.2,3321.2 3596,3317.3 3597.1,3313.1 3597.5,3308.7

## Silkscreen, mask and mechanical layers (free items; w line width, h text height)
Top Silkscreen Layer:
  text "IMU" at 3272.5,3105 h45
  text "MMU" at 3682.5,3100 h45
Bottom Silkscreen Layer:
  text "IMU 0x6A / MMU 0x30" at 3382.5,3090 h45
Mechanical Layer:
  drawing of 512 lines, arcs and shapes, not listed